# Altium PCB PCB1.PcbDoc (part 2 of 4)
Units mm, origin at the board's own origin, x right, y up, seen from the top; angles counter-clockwise.
Board outline 159.38 x 83.25 mm, 8 copper layers (Top Layer 1, GND, Signal 1, Signal 2, Power, Signal 3, Signal 4, Bottom Layer), stack 1.998 mm thick; 345 components, 291 nets, 1244 pads, 614 vias.
Unrouted connection lines stored in the file: 12.
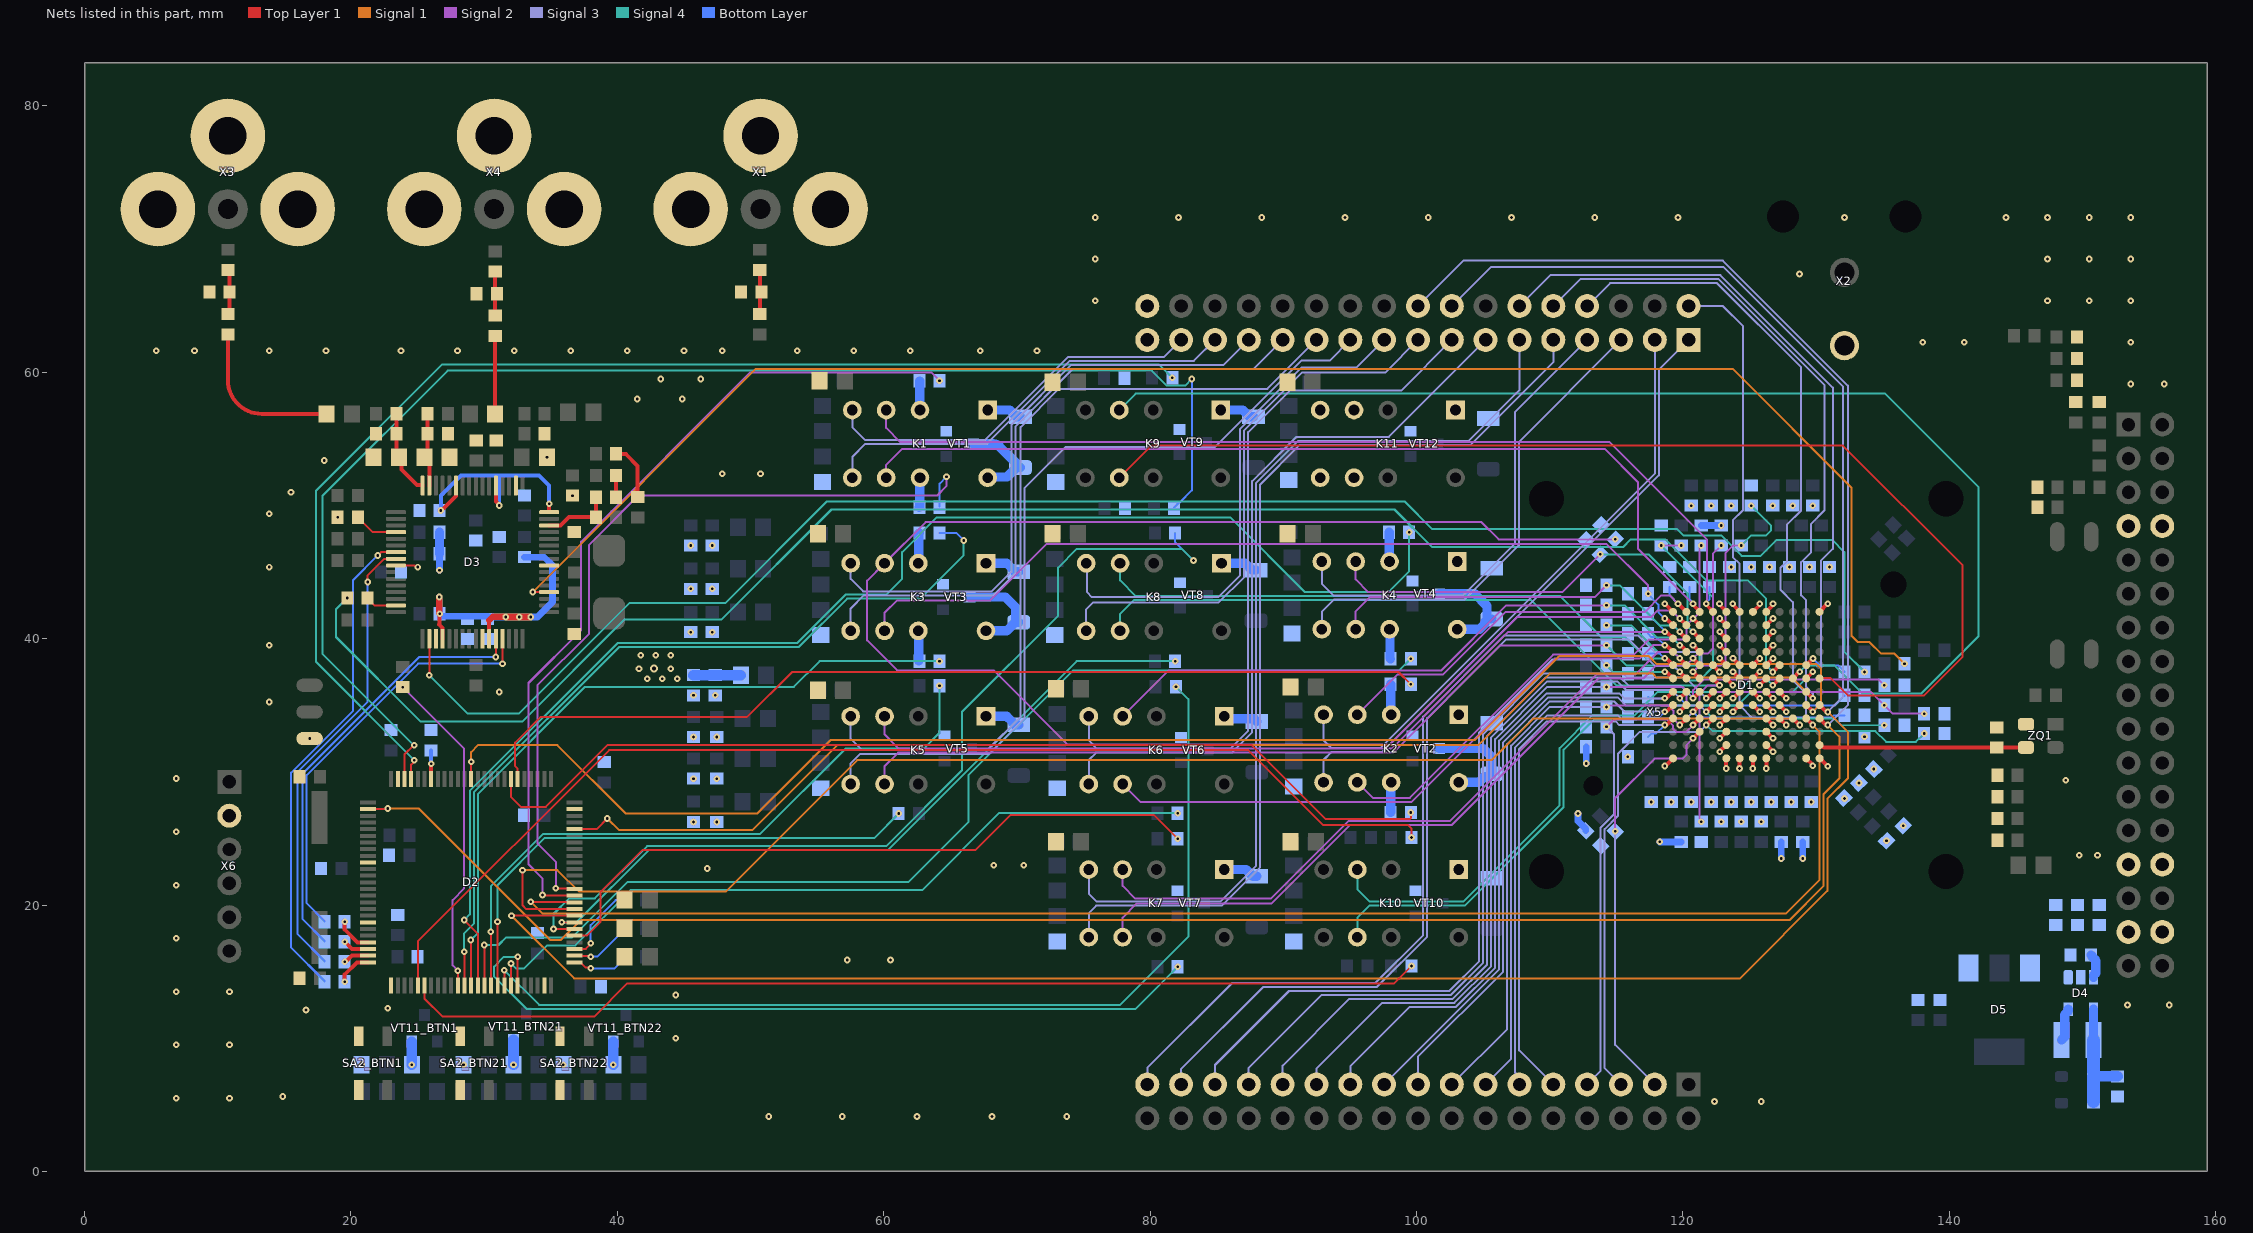
[diagram p8: the nets of this part, all layers, seen from the top]

## Via types
v1: diameter 0.5, hole 0.2, Top Layer 1 to Bottom Layer, tented both sides, 605 vias
v2: diameter 0.6, hole 0.3, Top Layer 1 to Bottom Layer, tented bottom, 6 vias
v3: diameter 0.6, hole 0.3, Top Layer 1 to Bottom Layer, tented both sides, 3 vias

## Nets (pads, with @x,y where several pads share a name; then routed paths per layer and width w, separated by ;. In a path a pad name is that pad's centre, name@x,y a point inside that pad or via, vN(x,y) a via of type N, cw(c..) or ccw(c..) an arc to the next point about the centre after c; other vN are vias at no path point) (continued)
+3.3V_VDDIO: C60.2 C61.2 C62.2 C63.2 D3.4 D3.11 L6.2 R46.2 R47.2 R64.2 R74.2 R153.2 | length 29.7
  Top Layer 1 w0.3: v1(26.655,41.875) 26.64,41.86 26.64,41.086 26.625,41.071 26.878,40.818 D3.4@26.878,39.994 ; D3.11@30.378,39.994 30.378,41.378
  Top Layer 1 w0.5: v1(26.625,43.125) 26.625,41.905 v1(26.655,41.875) ; 30.378,41.378 30.642,41.642 31.608,41.642 v1(31.625,41.625) v1(32.625,41.625) v1(33.5,41.625)
  Bottom Layer w0.5: v1(26.625,43.125) 26.625,41.905 26.848,41.682 30.308,41.682 30.365,41.625 v1(31.625,41.625) v1(32.625,41.625) v1(33.5,41.625) 34,41.625 35.125,42.75 35.125,45.5 34.51,46.115 R64.2@33.02,46.115 ; v1(26.645,45.145) R46.2@26.645,46.375
  Bottom Layer w0.7: R46.2@26.645,46.375 R47.2@26.645,48
  Bottom Layer w0.8: C61.2@45.719,37.26 45.719,37.25 L6.2@49.269,37.25
  other v1: 42.25,37 43.375,37 44.5,37 41.625,37.75 44,37.75 41.75,38.75 42.875,38.75 44,38.75 19,49.125
  other v2: 42.75,37.75
+5V: C69.1 C71.1 C72.1 D4.1 D5.3 K1.1 K2.1 K3.1 K4.1 K5.1 K6.1 K7.1 K8.1 K9.1 K10.1 K11.1 R171.1 VD15.2 VD16.2 VD17.2 VD18.2 VD19.2 VD20.2 VD21.2 VD28.2 VD29.2 VD30.2 VD31.2 X5.+5V | length 18.9
  Bottom Layer w0.7: K5.1@67.675,34.165 69.228,34.165 69.638,33.755 69.638,33.725 69.838,33.525 VD19.2@70.138,33.525 ; K3.1@67.675,45.665 69.228,45.665 69.638,45.255 69.638,45.225 69.838,45.025 VD17.2@70.138,45.025 ; K1.1@67.8,57.165 69.45,57.165 69.963,56.652 VD15.2@70.263,56.652 ; K9.1@85.3,57.165 86.95,57.165 87.463,56.652 VD30.2@87.763,56.652 ; K8.1@85.359,45.663 87.136,45.663 87.649,45.15 VD29.2@87.949,45.15 ; K7.1@85.55,22.665 87.2,22.665 87.713,22.152 VD28.2@88.013,22.152 ; K6.1@85.55,34.165 85.715,34 87.492,34 87.513,33.979 87.813,33.979 VD20.2@88.013,33.779
ADDR0: D1.H12 D2.58 X5.24 | length 182.9
  Top Layer 1 w0.15: v1(32.051,19.202) D2.58@36.768,19.202
  Top Layer 1 w0.3: D1.H12@130.275,34.995 130.713,34.557 130.818,34.557 v1(130.875,34.5)
  Signal 1 w0.15: v1(32.051,19.202) 36.753,14.5 124.287,14.5 130.85,21.063 130.85,27.975 132.375,29.5 132.375,33 v1(130.875,34.5)
  Signal 3 w0.15: X5.24@102.646,64.972 105.571,67.897 123.054,67.897 132,58.951 132,35.625 v1(130.875,34.5)
ADDR1: D1.J10 D2.59 X5.17 | length 148.3
  Top Layer 1 w0.15: v1(32.875,22.625) 32.875,20 33.173,19.702 D2.59@36.768,19.702
  Top Layer 1 w0.3: D1.J10@128.256,34.014 128.259,34.014 128.758,33.515 v1(128.761,33.515)
  Signal 1 w0.15: v1(32.875,22.625) 35.5,22.625 37.125,21 48.122,21 57.997,30.875 105.625,30.875 108.75,34 128.277,34 v1(128.761,33.515)
  Signal 3 w0.15: X5.17@120.426,64.972 123.009,64.972 124.5,63.481 124.5,49.625 123.75,48.875 123.75,46.125 124.25,45.625 124.25,35 125.25,34 126.375,34 128.277,34 v1(128.761,33.515)
ADDR2: D1.J11 D2.60 X5.20 | length 161.9
  Top Layer 1 w0.15: v1(33.5,20.25) 33.524,20.226 36.744,20.226 D2.60@36.768,20.202
  Top Layer 1 w0.3: D1.J11@129.256,34.014 D1.J11@129.256,34.014 129.756,33.515 v1(129.757,33.515)
  Signal 1 w0.15: v1(33.5,20.25) 34.375,19.375 127.75,19.375 130.25,21.875 130.25,32.625 130.25,33.023 v1(129.757,33.515)
  Signal 3 w0.15: X5.20@112.806,64.972 114.531,66.697 122.557,66.697 128.875,60.379 128.875,49.625 127.8,48.55 127.8,45.786 127.326,45.312 127.326,43.674 128.25,42.75 128.25,36.875 129.25,35.875 129.25,34.023 v1(129.757,33.515)
ADDR3: D1.J12 D2.2 X5.25 | length 192.5
  Top Layer 1 w0.15: D2.2@21.268,27.202 21.292,27.226 22.726,27.226 v1(22.75,27.25)
  Top Layer 1 w0.3: D1.J12@130.275,33.995 130.697,33.573 130.818,33.573 v1(130.875,33.515)
  Signal 1 w0.15: v1(22.75,27.25) 25.074,27.25 34.949,17.375 35.75,17.375 37.25,18.875 128,18.875 130.55,21.425 130.55,28.3 131.75,29.5 131.75,32.64 v1(130.875,33.515)
  Signal 3 w0.15: X5.25@100.106,64.972 103.509,68.375 123,68.375 132.375,59 132.375,35.015 v1(130.875,33.515)
AGND_5: D3.32 D3.37 D3.43 R98.1 | length 18.5
  Top Layer 1 w0.3: v1(26.75,49.625) 26.789,49.625 27.878,50.714 D3.43@27.878,51.494 ; D3.37@30.878,51.494 30.878,50.294 31.125,50.047 v1(31.125,50) ; D3.32@34.878,49.494 v1(34.878,50.128)
  Bottom Layer w0.3: R98.1@26.655,49.675 R98.1@26.655,49.625 v1(26.75,49.625) 26.75,50.75 28.25,52.25 31.125,52.25 ; v1(31.125,50) 31.125,52.25 ; v1(34.878,50.128) 34.878,51.497 34.125,52.25 31.125,52.25
ALSB_5: D3.52 R74.1 | length 3.4
  Top Layer 1 w0.15: R74.1@20.51,49.125 20.51,49.075 20.885,48.7 20.935,48.7 21.641,47.994 D3.52@23.378,47.994
BOOT0_3: D2.94 R45.1 | length 2.2
  Top Layer 1 w0.3: D2.94@26.018,29.452 v1(26.018,30.607)
  Bottom Layer w0.3: R45.1@26,31.615 26.018,31.597 v1(26.018,30.607)
Cb_1: C49.1 R99.1 | length 12.3
  Top Layer 1 w0.3: C49.1@10.76,62.854 10.76,59.415 ccw(c13.3,59.415) 13.3,56.875 R99.1@18.175,56.875
Cb_5: D3.48 R100.2 R101.2 R102.2 | length 6.4
  Top Layer 1 w0.3: R100.2@23.405,56.875 R101.2@23.405,55.375 23.405,53.814 23.806,53.413 23.806,52.694 24.954,51.546 25.378,51.546 D3.48@25.378,51.494
Cr_1: C50.1 R95.1 | length 5.9
  Top Layer 1 w0.3: R95.1@30.825,56.875 30.826,56.876 C50.1@30.826,62.727
Cr_5: D3.47 R94.2 R96.2 R97.2 | length 5.6
  Top Layer 1 w0.3: R96.2@25.76,56.875 R94.2@25.76,55.375 25.76,53.867 R97.2@25.511,53.618 25.878,53.251 D3.47@25.878,51.494
DGND_1: K11.4 R2.1 R3.1 R4.1 R5.1 R8.1 R9.1 R11.1 R12.1 R14.1 R15.1 R17.1 R18.1 R20.1 R21.1 R23.1 R24.1 R26.1 R27.1 R29.1 R30.1 R32.1 R33.1 R35.1 R36.1 R37.1 R38.1 R39.1 R40.1 R41.1 R42.1 R43.1 R44.1 | length 1.5
  Bottom Layer w0.5: R11.1@121.375,48.51 121.375,48.5 v1(122.875,48.5)
DGND_2: K11.9 R1.1 R6.1 R7.1 R10.1 R13.1 R16.1 R19.1 R22.1 R25.1 R28.1 R31.1 R34.1 R152.1 | length 6.9
  Bottom Layer w0.5: v1(112.125,26.875) 112.125,26.302 112.713,25.715 R10.1@112.713,25.588 ; R1.1@112.74,31.875 112.74,30.625 v1(112.75,30.625) ; v1(118.25,24.75) 118.26,24.74 R7.1@119.875,24.74 ; v1(127.375,23.5) R34.1@127.375,24.74 ; v1(129,23.5) R31.1@129,24.74
  other v1: 117.625,27.74 119.125,27.74 120.625,27.74 122.125,27.74 129.625,27.74 134.338,30.213 115.865,31.125 133.635,32.625
ELPF_5: D3.30 R56.1 R58.1 | length 5.3
  Top Layer 1 w0.3: D3.30@34.878,48.494 35.744,48.494 36.375,49.125 R56.1@38.385,49.125 R58.1@38.385,50.625
FIELD_1: D1.E9 R73.2 | length 129.6
  Top Layer 1 w0.3: v1(126.75,37.5) 126.75,37.504 127.256,38.01 D1.E9@127.256,38.014
  Signal 4 w0.15: v1(19.73,43.053) 18.875,42.198 18.875,40.125 25.225,33.775 32.847,33.775 40.497,41.425 47.8,41.425 56.075,49.7 98.343,49.7 101.168,46.875 115.5,46.875 116.075,47.45 118.675,47.45 121.75,44.375 124.875,44.375 126.25,43 126.25,38 v1(126.75,37.5)
FIELD_5: D3.63 R73.1 | length 2.4
  Top Layer 1 w0.15: R73.1@21.25,43.053 21.25,43.003 21.759,42.494 D3.63@23.378,42.494
FMC_D0: D2.61 R107.2 | length 63.5
  Top Layer 1 w0.15: v1(34.375,20.75) 34.423,20.702 D2.61@36.768,20.702
  Signal 2 w0.15: v1(34.375,20.75) 34.375,22 33.325,23.05 33.325,36.674 37.275,40.624 37.275,47.291 49.984,60 63.556,60 v1(64.187,59.369)
FMC_D1: D2.62 R109.2 | length 61.2
  Top Layer 1 w0.15: v1(35.375,21.25) 35.399,21.226 36.744,21.226 D2.62@36.768,21.202
  Signal 2 w0.15: v1(35.375,21.25) 35.375,23.25 34,24.625 34,36.5 37.875,40.375 37.875,47.043 41.582,50.75 64,50.75 64.705,51.455 v1(64.705,52.15)
  Bottom Layer w0.15: R109.2@64.187,49.919 64.187,51.632 v1(64.705,52.15)
FMC_D2: D2.81 R103.2 | length 72.7
  Top Layer 1 w0.15: D2.81@32.518,29.452 32.518,30.232 32.325,30.425 32.325,32.2 34.25,34.125 49.75,34.125 53.125,37.5 98.646,37.5 v1(99.57,36.576)
FMC_D3: D2.82 R110.2 | length 73.9
  Top Layer 1 w0.15: D2.82@32.018,29.452 32.018,28.107 32.75,27.375 34.625,27.375 39.25,32 87.618,32 93.173,26.445 99.482,26.445 99.57,26.533 v1(99.57,26.951)
FMC_D4: D2.37 R104.2 | length 62.1
  Top Layer 1 w0.15: v1(28.5,16.5) 28.509,16.491 28.509,13.961 D2.37@28.518,13.952
  Signal 4 w0.15: v1(28.5,16.5) 28.5,17.875 29.225,18.6 29.225,28.456 40.144,39.375 53.625,39.375 57.25,43 62.75,43 66,46.25 v1(66,47.375)
  Bottom Layer w0.15: R104.2@64.189,47.939 65.436,47.939 v1(66,47.375)
FMC_D5: D2.38 R111.2 | length 53.4
  Top Layer 1 w0.15: v1(29,17.375) 29.009,17.366 29.009,13.961 D2.38@29.018,13.952
  Signal 4 w0.15: v1(29,17.375) 29.525,17.9 29.525,28.332 37.568,36.375 53.25,36.375 55.189,38.314 v1(64.189,38.314)
FMC_D6: D2.39 R105.2 | length 101.3
  Top Layer 1 w0.15: v1(28.5,18.875) 29.518,17.857 D2.39@29.518,13.952
  Signal 4 w0.15: v1(28.5,18.875) 28.925,19.3 28.925,28.58 40.02,39.675 53.501,39.675 57.126,43.3 60.175,43.3 61.375,44.5 61.375,46.5 63.975,49.1 86.025,49.1 91.625,43.5 97.875,43.5 99.445,45.07 v1(99.445,47.997)
FMC_D7: D2.40 R112.2 | length 83.6
  Top Layer 1 w0.15: v1(30,17) 30.009,16.991 30.009,13.961 D2.40@30.018,13.952
  Signal 4 w0.15: v1(30,17) 31.076,17 31.651,17.575 36.601,17.575 40.751,21.725 61.849,21.725 66.375,26.251 66.375,29.771 74.229,37.625 98.698,37.625 v1(99.57,38.497)
FMC_D8: D2.41 R106.2 | length 49.5
  Top Layer 1 w0.15: v1(30.5,18) 30.509,17.991 30.509,13.961 D2.41@30.518,13.952
  Signal 4 w0.15: v1(30.5,18) 30.5,21.424 34.401,25.325 50.7,25.325 57.125,31.75 63,31.75 64.185,32.935 v1(64.185,36.463)
FMC_D9: D2.42 R113.2 | length 39.9
  Top Layer 1 w0.15: v1(31,18.75) 31.009,18.741 31.009,13.961 D2.42@31.018,13.952
  Signal 4 w0.15: v1(31,18.75) 31,21.5 34.525,25.025 59.275,25.025 v1(61.125,26.875)
FMC_D10: D2.43 R108.2 | length 74.9
  Top Layer 1 w0.15: D2.43@31.518,13.952 v1(31.518,15.107)
  Signal 4 w0.15: v1(31.518,15.107) 34.125,12.5 77.75,12.5 82.875,17.625 82.875,35.457 v1(81.937,36.395)
FMC_D11: D2.44 R114.2 | length 56.7
  Top Layer 1 w0.15: D2.44@32.018,13.952 v1(32.018,15.607)
  Signal 4 w0.15: v1(32.018,15.607) 32.375,15.25 33,15.25 34.725,16.975 36.85,16.975 41,21.125 62.875,21.125 68.645,26.895 v1(82.062,26.895)
FMC_D12: D2.45 R134.2 | length 58.6
  Top Layer 1 w0.15: D2.45@32.518,13.952 v1(32.518,16.107)
  Signal 4 w0.15: v1(32.518,16.107) 31.482,16.107 30.75,15.375 30.75,14.625 33.175,12.2 78.905,12.2 v1(82.064,15.359)
FMC_D13: D2.55 R127.2 | length 51.1
  Top Layer 1 w0.15: D2.55@36.768,17.702 37.702,17.702 38.75,18.75 38.75,21 41.875,24.125 66.875,24.125 69.5,26.75 80.298,26.75 v1(82.064,24.984)
FMC_D14: D2.56 R128.2 | length 69.8
  Top Layer 1 w0.15: v1(35.202,18.202) D2.56@36.768,18.202
  Signal 4 w0.15: v1(35.202,18.202) 35.202,19.327 36.375,20.5 38.304,20.5 42.229,24.425 60.18,24.425 65.875,30.12 65.875,34.521 73.086,41.732 73.086,45.336 74.5,46.75 82.375,46.75 v1(83.25,45.875)
  Bottom Layer w0.15: R128.2@81.875,47.933 81.875,47.25 v1(83.25,45.875)
FMC_D15: D2.57 R133.2 | length 55.1
  Top Layer 1 w0.15: v1(35.827,18.702) D2.57@36.768,18.702
  Signal 4 w0.15: v1(35.827,18.702) 36.931,18.702 42.354,24.125 60.304,24.125 74.487,38.308 v1(81.875,38.308)
GND: C1.1 C2.2 C3.2 C4.2 C5.2 C6.2 C7.2 C8.2 C9.2 C10.2 C11.2 C12.2 C13.2 C14.2 C15.2 C16.2 C17.2 C18.2 C19.2 C20.2 C21.2 C22.2 C23.2 C24.2 C25.2 C26.2 C27.2 C28.2 C29.2 C30.2 C31.2 C32.2 C33.1 C34.1 C35.1 C36.1 C37.1 C38.1 C39.1 C40.1 C41.1 C42.1 C43.1 C44.1 C45.1 C46.1 C47.1 C51.2 C52.2 C53.1 C55.1 C57.2 C58.2 C59.2 C60.1 C61.1 C62.1 C63.1 C64.1 C65.1 C66.1 C67.1 C68.1 C69.2 C70.2 C71.2 C72.2 C73.2 C74.2 C75_BTN1.1 C75_BTN21.1 C75_BTN22.1 C76.1 C77.1 C78.1 C79.1 C80.1 C81.1 C82.2 C83.2 D1.A1 D1.A5 D1.A6 D1.A7 D1.A8 D1.A12 D1.B5 D1.B8 D1.C5 D1.C8 D1.D5 D1.D8 D1.E4 D1.E5 D1.E6 D1.E7 D1.E8 D1.F5 D1.F6 D1.F7 D1.F8 D1.G5 D1.G6 D1.G7 D1.G8 D1.G9 D1.H5 D1.H6 D1.H7 D1.H8 D1.H9 D1.J5 D1.J8 D1.J9 D1.K5 D1.K8 D1.L5 D1.L8 D1.M1 D1.M5 D1.M6 D1.M7 D1.M8 D1.M11 D1.M12 D2.10 D2.19 D2.26 D2.49 D2.74 D2.99 D3.3 D3.10 D3.24 D3.34 D3.57 D4.2 D5.1 K11.5 K11.8 KP3.1 R45.2 R50.1 R52.2 R54.2 R90.1 R93.1 R94.1 R97.1 R98.2 R101.1 R102.1 R121.1 R122.1 R123.1 R124.1 R125.1 R126.1 R132.2 R137.2 R143.1 R144.1 R145.1 R146.1 R149_BTN1.1 R149_BTN21.1 R149_BTN22.1 R151.1 SA2_BTN1.2 SA2_BTN1.3 SA2_BTN21.2 SA2_BTN21.3 SA2_BTN22.2 SA2_BTN22.3 VD1.2 VD2.2 VD3.2 VD4.2 VD5.2 VD6.2 VD7.2 VD8.2 VD9.2 VD10.2 VD11.2 VD12.2 VD13.2 VD14.2 VT1.2 VT2.2 VT3.2 VT4.2 VT5.2 VT6.2 VT7.2 VT8.2 VT9.2 VT10.2 VT11_BTN1.2 VT11_BTN21.2 VT11_BTN22.2 VT12.2 X1.2 X2.2 X3.2 X4.2 X5.GND X6.2 ZQ1.2 | length 40.2
  Top Layer 1 w0.15: D3.57@23.378,45.494 24.786,45.494 24.905,45.375 v1(25,45.375)
  Top Layer 1 w0.3: v1(118.625,30.442) 118.684,30.442 D1.M1@119.256,31.014 ; v1(118.625,42.625) 118.635,42.625 119.227,42.033 D1.A1@119.275,42.033 ; D1.E4@122.256,38.014 122.256,38.004 122.75,37.51 v1(122.75,37.5) ; v1(122.75,42.625) 122.75,42.547 123.264,42.033 D1.A5@123.275,42.033 ; v1(122.757,38.518) 122.757,38.515 123.256,38.017 D1.E5@123.256,38.014 ; v1(122.757,39.505) 122.761,39.505 123.252,39.014 D1.D5@123.256,39.014 ; v1(122.757,40.515) D1.C5@123.256,40.014 ; v1(122.757,41.51) 122.759,41.51 D1.B5@123.256,41.014 D1.B5@123.256,41.014 ; v1(122.758,31.512) v1(122.758,31.512) D1.L5@123.256,32.014 D1.L5@123.256,32.014 ; v1@122.758,32.515 D1.K5@123.256,33.014 ; v1@122.758,33.516 D1.J5@123.256,34.014 ; v1(122.758,34.515) D1.H5@123.256,35.014 ; v1@122.759,35.518 D1.G5@123.256,36.014 ; D1.M5@123.237,30.995 123.25,30.982 v1(123.25,30.25) ; D1.F5@123.256,37.014 123.256,37.004 123.75,36.51 v1(123.75,36.5) ; v1(123.75,42.625) 123.75,42.547 124.264,42.033 D1.A6@124.275,42.033 ; v1(123.759,34.515) D1.H6@124.256,35.014 ; v1(123.759,35.518) D1.G6@124.256,36.014 ; v1(123.759,37.518) 123.759,37.514 124.256,37.017 D1.F6@124.256,37.014 ; v1(123.759,38.518) 123.759,38.515 124.256,38.018 D1.E6@124.256,38.014 ; D1.M6@124.248,30.995 124.253,30.99 124.253,30.253 v1(124.25,30.25) ; v1(125.25,30.25) 125.253,30.253 125.253,30.973 D1.M7@125.275,30.995 ; D1.H7@125.256,35.014 125.261,35.014 125.757,34.518 v1(125.762,34.518) ; D1.G7@125.256,36.014 125.261,36.014 125.757,35.518 v1(125.762,35.518) ; D1.F7@125.256,37.014 v1@125.759,37.517 ; D1.E7@125.256,38.014 125.259,38.014 125.759,38.514 v1(125.762,38.514) ; D1.A7@125.275,42.033 125.693,42.451 125.693,42.568 v1@125.75,42.625 ; v1(125.75,36.5) 125.75,36.504 126.256,37.01 D1.F8@126.256,37.014 ; v1@126.256,30.256 D1.M8@126.256,31.014 ; D1.L8@126.256,32.014 v1(126.757,31.512) ; D1.K8@126.256,33.014 126.259,33.014 126.754,32.518 v1(126.757,32.518) ; D1.H8@126.256,35.014 126.259,35.014 126.754,34.518 v1(126.757,34.518) ; D1.G8@126.256,36.014 126.259,36.014 126.754,35.518 v1(126.757,35.518) ; D1.E8@126.256,38.014 v1(126.757,38.514) ; D1.C8@126.256,40.014 v1(126.756,40.514) ; D1.B8@126.256,41.014 D1.B8@126.256,41.014 v1(126.756,41.51) v1(126.756,41.51) ; D1.J8@126.256,34.014 v1@126.756,33.515 ; D1.D8@126.256,39.014 v1(126.757,39.514) ; D1.A8@126.275,42.033 126.693,42.451 126.693,42.568 v1@126.75,42.625 ; D1.J9@127.256,34.014 127.257,34.014 127.756,33.515 v1(127.757,33.515) ; D1.H9@127.256,35.014 127.259,35.014 127.755,34.518 v1(127.757,34.518) ; D1.G9@127.256,36.014 127.258,36.014 127.754,35.518 v1@127.757,35.518 ; D1.M11@129.256,31.014 129.757,30.513 v1(129.757,30.448) ; D1.M12@130.256,31.014 130.273,31.014 130.858,30.43 v1(130.875,30.43) ; D1.A12@130.256,42.014 v1(130.867,42.625)
  Bottom Layer w0.8: v1(24.57,8) VT11_BTN1.2@24.57,9.75 ; v1(32.195,8) VT11_BTN21.2@32.195,9.875 ; v1(39.695,8) VT11_BTN22.2@39.695,9.75
  other v1: 51.375,4.125 56.875,4.125 62.5,4.125 68.125,4.125 73.75,4.125 122.375,5.25 125.875,5.25 6.875,5.5 10.875,5.5 14.875,5.625 20.8,8 28.445,8 35.945,8 6.875,9.5 10.875,9.5 44.375,10 16.625,12.125 22.75,12.25 153.375,12.5 156.5,12.5 44.375,13.25 6.875,13.5 10.875,13.5 57.25,15.875 60.5,15.875 6.875,17.5 6.875,21.5 46.75,22.75 68.25,23 70.5,23 149.75,23.75 151.125,23.75 135.287,24.838 6.875,25.5 136.537,25.963 45.719,26.24 47.469,26.24 122.875,26.26 124.375,26.26 125.875,26.26 123.625,27.74 125.125,27.74 126.625,27.74 128.125,27.74 132.125,28 133.213,29.162 148.75,29.375 45.719,29.49 47.469,29.49 6.875,29.5 126.25,30.25 16.895,32.5 122.758,32.514 45.719,32.615 47.469,32.615 122.758,33.515 126.757,33.515 13.875,35.25 122.758,35.518 127.757,35.518 45.719,35.74 47.344,35.74 31.125,36 125.762,37.518 13.875,39.5 45.5,40.49 47.125,40.49 125.758,42.625 126.756,42.625 47.125,43.74 45.5,43.75 13.875,45.375 123.625,45.375 125.125,45.375 126.5,45.385 128,45.385 129.5,45.385 131,45.385 45.5,46.99 47.125,46.99 13.875,49.375 120.625,49.99 122.125,49.99 123.625,49.99 126.75,49.99 128.25,49.99 129.75,49.99 36.625,50.74 15.5,51 47.875,52.375 50.75,52.375 18,53.375 34.72,53.618 41.5,58 44.875,58 153.625,59.125 156.125,59.125 43.25,59.5 46.25,59.5 5.375,61.625 8.25,61.625 13.875,61.625 18.125,61.625 23.75,61.625 28,61.625 32.25,61.625 36.5,61.625 40.75,61.625 45,61.625 47.875,61.625 53.5,61.625 57.75,61.625 62,61.625 67.25,61.625 71.5,61.625 138,62.25 141.125,62.25 153.625,62.25 75.875,65.375 147.375,65.375 150.5,65.375 153.625,65.375 128.75,67.375 75.875,68.5 147.375,68.5 150.5,68.5 153.625,68.5 75.875,71.625 82.125,71.625 88.375,71.625 94.625,71.625 100.875,71.625 107.125,71.625 113.375,71.625 119.625,71.625 132.125,71.625 144.25,71.625 147.375,71.625 150.5,71.625 153.625,71.625
GPO0_1: D2.22 R77.2 | length 2.7
  Top Layer 1 w0.3: v1(19.53,18.75) 19.53,18.169 20.497,17.202 D2.22@21.268,17.202
GPO0_5: D3.13 R77.1 | length 31.6
  Top Layer 1 w0.15: v1(31.378,38.128) D3.13@31.378,39.994
  Bottom Layer w0.15: R77.1@18.01,18.75 18.01,18.8 16.662,20.148 16.662,29.753 25.037,38.128 v1(31.378,38.128)
GPO1_1: D2.23 R81.2 | length 2
  Top Layer 1 w0.3: v1(19.53,17.25) 20.078,16.702 D2.23@21.268,16.702
GPO1_5: D3.12 R81.1 | length 32.8
  Top Layer 1 w0.15: v1(30.875,38.625) 30.877,38.627 30.877,39.992 D3.12@30.878,39.994
  Bottom Layer w0.15: R81.1@18.01,17.25 18.01,17.3 16.362,18.948 16.362,29.877 25.11,38.625 v1(30.875,38.625)
GPO2_1: D2.24 R84.2 | length 1.9
  Top Layer 1 w0.3: v1(19.53,15.75) 19.611,15.75 20.063,16.202 D2.24@21.268,16.202
GPO2_5: D3.56 R84.1 | length 34.7
  Top Layer 1 w0.15: v1(21.25,44.25) 21.25,44.75 22.494,45.994 D3.56@23.378,45.994
  Bottom Layer w0.15: R84.1@18.01,15.75 18.01,15.8 16,17.81 16,30.011 21.25,35.261 v1(21.25,44.25)
GPO3_1: D2.25 R87.2 | length 2.6
  Top Layer 1 w0.3: v1(19.53,14.25) 19.53,14.78 20.452,15.702 D2.25@21.268,15.702
GPO3_5: D3.55 R87.1 | length 37.2
  Top Layer 1 w0.15: v1(22,46.25) 22.019,46.25 22.263,46.494 D3.55@23.378,46.494
  Bottom Layer w0.15: R87.1@18.01,14.25 18.01,14.3 15.5,16.81 15.5,29.936 20.155,34.591 20.155,44.405 v1(22,46.25)
HDATA0: D1.A4 K1.4 R2.2 | length 73.4
  Top Layer 1 w0.3: v1(121.75,42.625) 121.75,42.547 122.264,42.033 D1.A4@122.275,42.033
  Signal 2 w0.15: K1.4@60.18,57.165 60.18,55.82 61.25,54.75 114.5,54.75 121.8,47.45 121.8,42.675 v1(121.75,42.625)
  Bottom Layer w0.15: v1(121.75,42.625) 121.75,42.72 122,42.97 R2.2@122,43.865
HDATA0_F: K1.5 X5.16 | length 29.5
  Signal 3 w0.15: K1.5@57.64,57.165 57.64,55.86 58.575,54.925 67.609,54.925 73.834,61.15 81.044,61.15 X5.16@82.326,62.432
HDATA1: D1.A3 K1.9 R4.2 | length 71.9
  Top Layer 1 w0.3: v1(120.75,42.625) 120.75,42.547 121.264,42.033 D1.A3@121.275,42.033
  Signal 2 w0.15: K1.9@60.18,52.085 60.18,53.055 61.375,54.25 114.125,54.25 116.625,51.75 116.625,46.75 v1(120.75,42.625)
  Bottom Layer w0.15: R4.2@120.5,43.865 120.5,42.97 120.75,42.72 v1(120.75,42.625)
HDATA1_F: K1.8 X5.15 | length 32.4
  Signal 3 w0.15: K1.8@57.64,52.085 57.64,53.64 58.625,54.625 67.734,54.625 73.959,60.85 83.284,60.85 X5.15@84.866,62.432
HDATA2: D1.A2 K2.4 R8.2 | length 30.4
  Top Layer 1 w0.3: v1(119.625,42.625) 119.635,42.625 120.227,42.033 D1.A2@120.275,42.033
  Signal 2 w0.15: K2.4@95.555,34.29 98.59,37.325 101.999,37.325 106.674,42 117.125,42 118.375,43.25 119,43.25 v1(119.625,42.625)
  Bottom Layer w0.15: R8.2@119,43.865 119,43.25 v1(119.625,42.625)
HDATA2_F: K2.5 X5.2 | length 45.6
  Signal 3 w0.15: K2.5@93.015,34.29 93.015,32.36 93.575,31.8 97.3,31.8 117.886,52.386 X5.2@117.886,62.432
HDATA3: D1.B3 K2.9 R11.2 | length 38.1
  Top Layer 1 w0.3: v1(120.761,41.51) D1.B3@121.256,41.014
  Signal 2 w0.15: K2.9@95.555,29.21 96.715,28.05 99.501,28.05 110.251,38.8 116.3,38.8 117.434,39.934 119.934,39.934 120.25,40.25 120.25,40.998 v1(120.761,41.51) 121.25,41.998 121.25,46.77 121.375,46.895 v1(121.375,46.99)
HDATA3_F: K2.8 X5.1 | length 46.8
  Signal 3 w0.15: K2.8@93.015,29.21 93.015,30.89 93.625,31.5 97.424,31.5 118.186,52.262 118.186,60.192 X5.1@120.426,62.432
HDATA4: D1.B2 K3.4 R14.2 | length 132.4
  Top Layer 1 w0.3: v1(119.755,41.51) 119.758,41.51 120.253,41.014 D1.B2@120.256,41.014
  Signal 2 w0.15: v1(114.912,47.463) 106.162,47.463 104.875,48.75 63.14,48.75 K3.4@60.055,45.665 58.75,44.36 58.75,39.875 61,37.625 68.25,37.625 73.825,32.05 98.001,32.05 107.576,41.625 117.625,41.625 118.125,42.125 119.14,42.125 v1(119.755,41.51)
HDATA4_F: K3.5 X5.14 | length 45.7
  Signal 3 w0.15: K3.5@57.515,45.665 57.515,44.485 58.45,43.55 68.104,43.55 69.575,45.021 69.575,45.374 69.575,56.042 74.083,60.55 85.524,60.55 X5.14@87.406,62.432
HDATA5: D1.B1 K3.9 R17.2 | length 65.9
  Top Layer 1 w0.3: v1(118.625,41.51) 118.682,41.452 118.818,41.452 D1.B1@119.237,41.033
  Signal 2 w0.15: K3.9@60.055,40.585 60.055,41.93 61,42.875 68,42.875 72.25,47.125 114.25,47.125 117.385,43.99 v1(117.385,43.375)
  Bottom Layer w0.15: v1(117.385,43.375) 117.385,43.325 118.159,42.551 118.159,41.976 v1(118.625,41.51)
HDATA5_F: K3.8 X5.13 | length 48.9
  Signal 3 w0.15: K3.8@57.515,40.585 57.515,42.265 58.5,43.25 68.229,43.25 69.875,44.896 69.875,45.25 69.875,55.918 74.207,60.25 87.764,60.25 X5.13@89.946,62.432
HDATA6: D1.C3 K4.4 R20.2 | length 32.8
  Top Layer 1 w0.3: v1@120.761,40.515 120.761,40.512 121.256,40.017 D1.C3@121.256,40.014
  Signal 2 w0.15: K4.4@95.43,45.79 95.43,44.445 96.375,43.5 110.95,43.5 v1(113.787,46.338)
  Signal 4 w0.15: v1(113.787,46.338) 117.412,46.338 120.325,43.425 120.325,40.948 v1(120.758,40.515)
HDATA6_F: K4.5 X5.4 | length 35.7
  Signal 3 w0.15: K4.5@92.89,45.79 92.89,44.11 93.75,43.25 103.5,43.25 107.375,47.125 107.375,57.001 X5.4@112.806,62.432
HDATA7: D1.C2 K4.9 R23.2 | length 28.6
  Top Layer 1 w0.3: v1(119.755,40.515) D1.C2@120.256,40.014
  Signal 2 w0.15: K4.9@95.43,40.71 95.43,42.055 96.5,43.125 113.385,43.125 v1(114.26,44)
  Signal 4 w0.15: v1(114.26,44) 115.25,44 118.25,41 119.27,41 v1(119.755,40.515)
HDATA7_F: K4.8 X5.3 | length 36.8
  Signal 3 w0.15: K4.8@92.89,40.71 92.89,42.015 93.825,42.95 103.624,42.95 107.675,47.001 107.675,54.761 X5.3@115.346,62.432
HDATA8: D1.C1 K5.4 R26.2 | length 66.7
  Top Layer 1 w0.3: v1(118.625,40.515) 118.682,40.457 118.813,40.457 D1.C1@119.237,40.033
  Signal 2 w0.15: K5.4@60.055,34.165 60.055,32.82 61.125,31.75 98.125,31.75 106.89,40.515 v1(118.625,40.515)
  Bottom Layer w0.15: R26.2@117.385,41.875 117.385,41.825 118.625,40.585 v1(118.625,40.515)
HDATA8_F: K5.5 X5.12 | length 62.5
  Signal 3 w0.15: K5.5@57.515,34.165 57.515,32.485 58.375,31.625 67.75,31.625 70.274,34.149 70.274,55.875 73.149,58.75 88.804,58.75 X5.12@92.486,62.432
HDATA9: D1.D3 K5.9 R29.2 | length 69.2
  Top Layer 1 w0.3: v1@120.758,39.509 v1(120.76,39.509) 121.254,39.014 D1.D3@121.256,39.014
  Signal 2 w0.15: K5.9@60.055,29.085 60.055,30.43 61.075,31.45 98.249,31.45 106.299,39.5 v1(114.26,39.5)
  Signal 4 w0.15: v1(114.26,39.5) 115.76,38 121,38 121.25,38.25 121.25,39.019 v1(120.76,39.509)
HDATA9_F: K5.8 X5.11 | length 62.4
  Signal 3 w0.15: K5.8@57.515,29.085 57.515,30.64 58.2,31.325 67.874,31.325 70.574,34.024 70.574,51.324 73.625,54.375 84.853,54.375 91.353,60.875 93.469,60.875 X5.11@95.026,62.432
HDATA10: D1.D2 K6.4 R32.2 | length 47.3
  Top Layer 1 w0.3: v1(119.755,39.509) 119.794,39.47 119.869,39.47 120.256,39.083 D1.D2@120.256,39.014
  Signal 2 w0.15: K6.4@77.93,34.165 81.39,37.625 101.875,37.625 106.75,42.5 v1(114.26,42.5)
  Signal 4 w0.15: v1(114.26,42.5) 115.625,42.5 118.035,40.09 119.174,40.09 v1(119.755,39.509)
HDATA10_F: K6.5 X5.8 | length 55.2
  Signal 3 w0.15: K6.5@75.39,34.165 75.39,32.36 76,31.75 86,31.75 87.35,33.1 87.35,55.511 90.464,58.625 98.839,58.625 X5.8@102.646,62.432
HDATA11: D1.D1 K6.9 R35.2 | length 48.5
  Top Layer 1 w0.3: v1(118.625,39.509) 118.682,39.451 118.819,39.451 D1.D1@119.237,39.033
  Signal 2 w0.15: K6.9@77.93,29.085 79.265,27.75 99.625,27.75 110.375,38.5 116.75,38.5 117.759,39.509 v1@118.621,39.509
  Bottom Layer w0.15: R35.2@117.385,40.375 117.637,40.123 118.01,40.123 v1(118.625,39.509)
HDATA11_F: K6.8 X5.7 | length 55.7
  Signal 3 w0.15: K6.8@75.39,29.085 75.39,30.89 75.95,31.45 86.124,31.45 87.65,32.976 87.65,51.824 90.985,55.159 97.913,55.159 X5.7@105.186,62.432
HDATA12: D1.E3 K7.9 R37.2 | length 62.9
  Top Layer 1 w0.3: v1(120.76,38.518) 120.76,38.514 121.256,38.018 D1.E3@121.256,38.014
  Signal 2 w0.15: K7.9@77.93,17.585 77.93,19.055 79,20.125 85.625,20.125 89.125,20.125 95,26 102.625,26 113.625,37 117,37 118,38 120.242,38 v1(120.76,38.518) 121.117,38.875 121.875,38.875 122.25,39.25 122.25,46.365 v1(122.875,46.99)
HDATA12_F: K7.8 X5.5 | length 72.3
  Signal 3 w0.15: K7.8@75.39,17.585 75.39,19.39 75.95,19.95 85.374,19.95 88.25,22.826 88.25,51.576 91.234,54.559 104.059,54.559 110.266,60.766 X5.5@110.266,62.432
HDATA13: D1.E2 K7.4 R39.2 | length 58.5
  Top Layer 1 w0.3: v1(119.755,38.518) 119.755,38.517 D1.E2@120.256,38.014 D1.E2@120.256,38.014
  Signal 2 w0.15: K7.4@77.93,22.665 77.93,21.445 78.888,20.487 89.063,20.487 94.876,26.3 102.501,26.3 113.501,37.3 116.425,37.3 118.125,39 119.274,39 v1(119.755,38.518)
  Signal 4 w0.15: v1(114.26,41) 116.125,41 118.125,39 119.274,39 v1(119.755,38.518)
HDATA13_F: K7.5 X5.6 | length 70.9
  Signal 3 w0.15: K7.5@75.39,22.665 75.39,20.86 76,20.25 85.25,20.25 87.95,22.95 87.95,51.7 91.109,54.859 103.935,54.859 107.726,58.65 X5.6@107.726,62.432
HDATA14: D1.E1 K8.4 R41.2 | length 46.8
  Top Layer 1 w0.3: v1(118.625,38.518) 118.682,38.461 118.809,38.461 D1.E1@119.237,38.033
  Signal 4 w0.15: K8.4@77.739,45.663 77.739,44.386 78.925,43.2 110.8,43.2 113.875,40.125 115.625,40.125 117.232,38.518 v1(118.625,38.518)
  Bottom Layer w0.15: R41.2@117.385,38.875 118.268,38.875 v1(118.625,38.518)
HDATA14_F: K8.5 X5.10 | length 39.1
  Signal 3 w0.15: K8.5@75.199,45.663 75.262,45.6 75.262,43.488 75.625,43.125 85.125,43.125 86.75,44.75 86.75,55.76 91.365,60.375 95.509,60.375 X5.10@97.566,62.432
HDATA15: D1.F4 K8.9 R43.2 | length 61.5
  Top Layer 1 w0.3: D1.F4@122.256,37.014 122.256,37.004 122.75,36.51 v1(122.75,36.5)
  Signal 2 w0.15: v1(121.382,26.268) 121.382,26.389 121.25,26.522 121.25,35.875 121.875,36.5 v1(122.75,36.5)
  Signal 4 w0.15: K8.9@77.739,40.583 77.739,41.864 78.775,42.9 108.6,42.9 115,36.5 v1(122.75,36.5)
HDATA15_F: K8.8 X5.9 | length 41.4
  Signal 3 w0.15: K8.8@75.199,40.583 75.199,42.199 75.724,42.724 85.148,42.724 87.05,44.626 87.05,55.635 91.415,60 97.674,60 X5.9@100.106,62.432
HDATA16_1: D1.F3 R44.2 R80.2 X5.49 | length 86.2
  Top Layer 1 w0.3: v1(120.76,37.515) 120.76,37.512 121.256,37.017 D1.F3@121.256,37.014
  Signal 2 w0.15: v1(120.76,37.515) 121.246,38 122.84,38 123.2,38.36 123.2,46.45 123.74,46.99 v1(124.375,46.99) ; v1@125.105,49.99 v1(125.125,49.99)
  Signal 3 w0.15: X5.49@79.786,6.532 79.786,7.786 86.15,14.15 96.9,14.15 100.5,17.75 100.5,34.151 106.596,40.248 116.627,40.248 117.875,39 121.125,39 121.375,38.75 121.375,38.129 v1(120.76,37.515)
  Signal 4 w0.15: v1(124.375,46.99) 125.135,47.75 126.25,47.75 126.625,48.125 126.625,48.49 v1(125.125,49.99)
HDATA17_1: D1.F2 R42.2 R83.2 X5.50 | length 78.7
  Top Layer 1 w0.3: v1(119.755,37.515) D1.F2@120.256,37.014
  Signal 2 w0.15: v1(118.375,46.99) v1(119.875,46.99)
  Signal 3 w0.15: X5.50@82.326,6.532 82.326,7.701 88.475,13.85 97.024,13.85 100.8,17.626 100.8,34.027 106.721,39.948 115.927,39.948 117.935,37.94 119.33,37.94 v1(119.755,37.515)
  Signal 4 w0.15: v1(118.375,46.99) 122.25,43.115 122.25,37.875 121.25,36.875 120.395,36.875 v1(119.755,37.515)
HDATA18_1: D1.F1 R40.2 R86.2 X5.51 | length 60.4
  Top Layer 1 w0.3: v1(118.625,37.515) 118.682,37.457 118.813,37.457 D1.F1@119.237,37.033
  Signal 3 w0.15: X5.51@84.866,6.532 84.866,7.991 90.425,13.55 102.463,13.55 104.7,15.787 104.7,32.959 110.166,38.425 113.835,38.425 v1(114.26,38)
  Signal 4 w0.15: v1(114.26,38) 114.745,37.515 v1(118.625,37.515)
  Bottom Layer w0.15: R40.2@117.385,37.375 117.525,37.515 v1(118.625,37.515)
HDATA19_1: D1.G4 R38.2 R89.2 X5.52 | length 76.7
  Top Layer 1 w0.3: v1(121.761,35.518) D1.G4@122.256,36.014
  Signal 2 w0.15: v1(121.761,35.518) 122.243,36 134.115,36 v1(135.115,35) 135.74,34.375 v1(138.115,34.375)
  Signal 3 w0.15: X5.52@87.406,6.532 87.375,6.563 87.375,7.75 92.875,13.25 102.587,13.25 105,15.663 105,32.835 109.565,37.4 115.475,37.4 115.785,37.09 120.189,37.09 v1(121.761,35.518)
HDATA20_1: D1.G3 R36.2 X5.53 | length 71.2
  Top Layer 1 w0.3: v1(120.76,35.518) D1.G3@121.256,36.014
  Signal 2 w0.15: v1(120.76,35.518) 120.76,36.135 121.55,36.925 134.69,36.925 v1(135.115,36.5)
  Signal 3 w0.15: X5.53@89.946,6.532 89.946,7.946 94.95,12.95 102.711,12.95 105.3,15.539 105.3,32.711 109.689,37.1 115.275,37.1 115.925,36.45 119.828,36.45 v1(120.76,35.518)
HDATA21_1: D1.G2 R33.2 X5.54 | length 64.7
  Top Layer 1 w0.3: v1@119.755,35.518 119.758,35.518 120.254,36.014 D1.G2@120.256,36.014
  Signal 3 w0.15: X5.54@92.486,6.532 92.486,7.712 97.424,12.65 102.835,12.65 105.6,15.415 105.6,32.587 109.813,36.8 115.075,36.8 115.725,36.15 119.129,36.15 v1(119.761,35.518)
  Bottom Layer w0.15: v1(119.761,35.518) 120.279,35 131.415,35 132.115,35.7 R33.2@132.115,35.75
HDATA22_1: D1.G1 R30.2 X5.56 | length 45.5
  Top Layer 1 w0.3: v1(118.625,35.518) 118.682,35.575 118.817,35.575 D1.G1@119.237,35.995
  Signal 3 w0.15: X5.56@97.566,6.532 106.2,15.166 106.2,32.338 109.762,35.9 115.225,35.9 115.607,35.518 v1(118.625,35.518)
  Bottom Layer w0.15: R30.2@117.385,35.625 117.492,35.518 v1(118.625,35.518)
HDATA23_1: D1.H4 R27.2 X5.57 | length 59.9
  Top Layer 1 w0.3: v1(121.761,34.515) 121.761,34.517 D1.H4@122.256,35.014 D1.H4@122.256,35.014
  Signal 3 w0.15: X5.57@100.106,6.532 100.106,8.606 106.5,15 106.5,32.214 109.886,35.6 115.101,35.6 115.701,35 121.276,35 v1(121.761,34.515)
  Signal 4 w0.15: v1(121.761,34.515) 122.276,34 131.375,34 131.875,33.5 v1(135.115,33.5)
HDATA24_1: D1.H3 R24.2 X5.60 | length 52.3
  Top Layer 1 w0.3: v1@120.825,34.575 120.825,34.579 121.256,35.01 D1.H3@121.256,35.014
  Signal 3 w0.15: X5.60@107.726,6.532 107.41,6.848 107.41,7.435 107.4,7.445 107.4,31.841 109.809,34.25 115.104,34.25 115.354,34 120.245,34 v1(120.76,34.515)
  Bottom Layer w0.15: v1@120.76,34.512 121.197,34.075 131.145,34.075 131.294,34.224 132.089,34.224 R24.2@132.115,34.25
HDATA25_1: D1.H2 R21.2 X5.55 | length 51.1
  Top Layer 1 w0.3: v1(119.761,34.512) 119.761,34.515 120.256,35.011 D1.H2@120.256,35.014
  Signal 2 w0.15: v1(114.26,36.375) 120,36.375 120.25,36.125 120.25,35.001 v1@119.764,34.515
  Signal 3 w0.15: X5.55@95.026,6.532 95.026,7.901 99.475,12.35 102.96,12.35 105.9,15.29 105.9,32.462 109.813,36.375 v1(114.26,36.375)
HDATA26_1: D1.H1 R18.2 X5.58 | length 43
  Top Layer 1 w0.3: v1(118.625,34.512) 118.682,34.569 118.811,34.569 D1.H1@119.237,34.995
  Signal 3 w0.15: X5.58@102.646,6.532 106.8,10.686 106.8,30.711 106.8,32.089 110.011,35.3 114.825,35.3 115.575,34.55 118.587,34.55 v1(118.625,34.512)
  Bottom Layer w0.15: R18.2@117.385,34.125 118.238,34.125 v1(118.625,34.512)
HDATA27_1: D1.J4 R15.2 X5.63 | length 51.1
  Top Layer 1 w0.3: v1(121.761,33.515) 121.761,33.517 122.256,34.012 D1.J4@122.256,34.014
  Signal 3 w0.15: X5.63@115.346,6.532 114.125,7.753 114.125,25.701 115.125,26.701 115.125,31.375 116.75,33 121.246,33 v1(121.761,33.515)
  Signal 4 w0.15: v1(121.761,33.515) 122.227,33.05 134.45,33.05 135.25,32.25 137.49,32.25 v1(138.115,32.875)
HDATA28_1: D1.J3 R12.2 X5.62 | length 36.4
  Top Layer 1 w0.3: v1(120.76,33.515) 120.76,33.517 121.256,34.013 D1.J3@121.256,34.014
  Signal 2 w0.15: v1(114.26,33.375) 114.825,33.94 118.801,33.94 119.25,33.492 119.25,33.25 119.5,33 120.245,33 v1(120.76,33.515)
  Signal 3 w0.15: X5.62@112.637,6.363 X5.62@112.637,6.701 ; X5.62@112.806,6.532 113.825,7.551 113.825,25.825 114.825,26.825 114.825,32.81 v1(114.26,33.375)
HDATA29_1: D1.J2 R9.2 X5.59 | length 41.8
  Top Layer 1 w0.3: v1(119.761,33.515) 119.761,33.517 120.256,34.012 D1.J2@120.256,34.014
  Signal 2 w0.15: v1(114.26,34.875) 114.355,34.875 114.48,35 118.875,35 119.281,34.594 119.281,33.995 v1(119.761,33.515)
  Signal 3 w0.15: X5.59@105.186,6.532 107.1,8.446 107.1,31.965 110.01,34.875 v1(114.26,34.875)
HDATA30_1: D1.J1 R5.2 X5.61 | length 40.6
  Top Layer 1 w0.3: v1(118.625,33.515) 118.682,33.573 118.815,33.573 D1.J1@119.237,33.995
  Signal 3 w0.15: X5.61@110.266,6.532 107.7,9.098 107.7,31.717 109.783,33.8 114.95,33.8 115.235,33.515 v1(118.625,33.515)
  Bottom Layer w0.15: R5.2@117.385,32.625 117.623,32.863 117.972,32.863 v1(118.625,33.515)
HDATA31_1: D1.K3 R3.2 X5.64 | length 31.6
  Top Layer 1 w0.3: v1(120.76,32.514) 120.76,32.516 121.256,33.012 D1.K3@121.256,33.014
  Signal 2 w0.15: v1(114.912,25.537) 114.912,28.037 117.875,31 120,31 120.25,31.25 120.25,32.004 v1(120.76,32.514)
  Signal 3 w0.15: v1(114.912,25.537) 114.912,9.506 X5.64@117.886,6.532
HSYNC_1: D1.E11 R68.2 | length 3.5
  Top Layer 1 w0.3: D1.E11@129.256,38.014 129.26,38.014 129.757,38.511 v1(129.761,38.511)
  Bottom Layer w0.15: v1(129.761,38.511) 130.272,38 131.665,38 132.115,37.55 R68.2@132.115,37.5
HSYNC_5: D3.2 R68.1 | length 129
  Top Layer 1 w0.15: v1(25.875,37.25) 25.877,37.252 25.877,39.992 D3.2@25.878,39.994
  Signal 4 w0.15: v1(25.875,37.25) 28.75,34.375 32.599,34.375 40.899,42.675 48.104,42.675 55.729,50.3 99.103,50.3 101.153,48.25 119.534,48.25 120.034,47.75 122.875,47.75 124.413,46.212 125.837,46.212 127.04,47.415 127.551,47.415 131.21,47.415 132.125,46.5 132.125,39.01 v1(133.635,37.5)
INTRQ: D2.36 R154.1 | length 24.9
  Top Layer 1 w0.15: D2.36@28.018,13.952 v1(28.018,15.075) v1@28.018,15.107
  Signal 2 w0.15: v1(23.875,36.365) 28.018,32.222 28.5,31.74 28.5,21.25 27.625,20.375 27.625,15.468 v1(28.018,15.075)
LED_ERROR_3: D2.53 R166.1 | length 6.2
  Top Layer 1 w0.15: D2.53@36.768,16.702 36.781,16.715 37.632,16.715 38,17.082 v1(38,17.125)
  Bottom Layer w0.15: v1(38,17.125) 38,18.5 39.875,20.375 R166.1@40.615,20.375
LED_READ_3: D2.51 R168.1 | length 4.4
  Top Layer 1 w0.15: D2.51@36.768,15.702 37.218,15.702 37.603,15.317 37.933,15.317 v1(38,15.25)
  Bottom Layer w0.15: v1(38,15.25) 39.79,15.25 40.615,16.075 R168.1@40.615,16.125
LED_WRITE_3: D2.52 R167.1 | length 4.8
  Top Layer 1 w0.15: D2.52@36.768,16.202 36.806,16.164 37.961,16.164 v1(38,16.125)
  Bottom Layer w0.15: v1(38,16.125) 38.49,16.125 40.19,17.825 40.24,17.825 40.615,18.2 R167.1@40.615,18.25
LLC_5: D3.20 R78.1 | length 126.8
  Top Layer 1 w0.15: v1(33.644,43.5) 33.654,43.49 D3.20@34.874,43.49
  Signal 1 w0.15: v1(33.644,43.5) 50.394,60.25 123.75,60.25 132.656,51.344 132.656,40.219 133.125,39.75 134,39.75 134.875,38.875 135.885,38.875 v1(136.635,38.125)
MCLK_2: C1.2 D1.L12 ZQ1.3 | length 15.6
  Top Layer 1 w0.3: D1.L12@130.256,32.014 ccw(c130.732,32.49) 130.732,31.817 C1.2@143.552,31.817 143.552,31.829 ZQ1.3@145.754,31.829
nACK: D1.G11 D2.71 X5.21 | length 149.1
  Top Layer 1 w0.15: D2.71@36.768,25.702 38.452,25.702 v1(39.25,26.5)
  Top Layer 1 w0.3: D1.G11@129.256,36.014 129.259,36.014 129.755,35.518 v1(129.757,35.518)
  Signal 1 w0.15: v1(39.25,26.5) 40.125,25.625 50.125,25.625 56.5,32 104.625,32 110,37.375 117.75,37.375 118.05,37.075 128.2,37.075 v1(129.757,35.518)
  Signal 3 w0.15: X5.21@110.266,64.972 112.291,66.997 122.681,66.997 130.625,59.053 130.625,49.625 129.625,48.625 129.625,46.5 128.875,45.75 128.875,43.25 129.25,42.875 129.25,36.375 129.746,35.879 129.746,35.529 v1(129.757,35.518)
nCS: D1.H11 D2.88 X5.22 | length 168.2
  Top Layer 1 w0.15: D2.88@29.018,29.452 v1(29.018,30.75)
  Top Layer 1 w0.3: D1.H11@129.256,35.014 129.259,35.014 129.754,34.518 v1(129.757,34.518)
  Signal 1 w0.15: v1(29.018,30.75) 29.018,31.488 29.53,32 35.5,32 40.625,26.875 50.5,26.875 56,32.375 104.375,32.375 110.7,38.7 117.425,38.7 118.039,38.086 130.039,38.086 130.375,37.75 130.375,35.136 v1(129.757,34.518)
  Signal 3 w0.15: X5.22@107.726,64.972 110.051,67.297 122.805,67.297 131.25,58.852 131.25,46.75 130.375,45.875 130.375,35.136 v1(129.757,34.518)
nDACK0: D1.F11 K10.9 | length 46.5
  Top Layer 1 w0.3: D1.F11@129.256,37.014 v1(129.757,37.518)
  Signal 4 w0.15: K10.9@95.555,17.585 95.555,19.055 96.45,19.95 103.624,19.95 111.039,27.364 111.039,31.664 113.325,33.95 116.499,33.95 117.549,35 124.125,35 125.125,36 128.24,36 v1(129.757,37.518)
nDACK0_STM: D2.31 R136.2 | length 77.2
  Top Layer 1 w0.15: D2.31@25.518,13.952 25.518,12.982 26.875,11.625 38.25,11.625 40.75,14.125 98.321,14.125 v1(99.615,15.42)
nDACK1: D1.F9 K10.4 | length 43.4
  Top Layer 1 w0.3: v1(126.75,36.5) 126.75,36.504 127.256,37.01 D1.F9@127.256,37.014
  Signal 4 w0.15: K10.4@95.555,22.665 95.555,21.195 96.5,20.25 103.5,20.25 110.739,27.489 110.739,31.114 110.739,31.788 113.201,34.25 116.375,34.25 118.125,36 124.125,36 125.125,37 126.25,37 v1(126.75,36.5)
nDACK1_STM: D2.30 R130.2 | length 87
  Top Layer 1 w0.15: D2.30@25.018,13.952 25.018,17.268 39.375,31.625 87.375,31.625 93,26 99.375,26 99.615,25.76 v1(99.615,25.072)
nDREQ0: D1.F12 K9.9 | length 87.4
  Top Layer 1 w0.15: K9.9@77.68,52.085 80.095,54.5 132,54.5 141,45.5 141,38.646 138.104,35.75 132.375,35.75 131.092,37.033 D1.F12@130.275,37.033
nDREQ0_STM: D2.98 R135.2 | length 104.5
  Top Layer 1 w0.15: D2.98@24.018,29.452 24.018,31.309 v1@24.709,32
  Signal 4 w0.15: v1@24.709,32 17.875,38.834 17.875,50.75 27.25,60.125 80.125,60.125 81.25,59 82.625,59 v1(83.125,59.5)
  Bottom Layer w0.15: R135.2@81.792,49.799 81.792,49.849 82.167,50.224 82.217,50.224 83.125,51.132 v1(83.125,59.5)
  other v1: 24.75,32
nDREQ1: D1.F10 K9.4 | length 96.1
  Top Layer 1 w0.3: D1.F10@128.256,37.014 v1(128.761,37.518)
  Signal 4 w0.15: K9.4@77.68,57.165 78.915,58.4 135.176,58.4 142.2,51.376 142.2,40.2 137.875,35.875 133.5,35.875 131.375,38 129.244,38 v1(128.761,37.518)
nDREQ1_STM: D2.97 R129.2 | length 93.5
  Top Layer 1 w0.15: D2.97@24.518,29.452 24.518,30.548 24.75,30.78 v1(24.75,30.875)
  Signal 4 w0.15: v1(24.75,30.875) 17.375,38.25 17.375,51.125 26.85,60.6 80.643,60.6 v1(81.665,59.578)
NetC48_2: C48.2 R49.2 R50.2 | length 3.4
  Top Layer 1 w0.3: C48.2@50.694,64.374 50.694,65.902 R50.2@50.819,66.027 50.694,66.152 R49.2@50.694,67.68
NetC49_2: C49.2 R51.2 R52.1 | length 3.4
  Top Layer 1 w0.3: C49.2@10.76,64.374 10.885,64.499 R52.1@10.885,66.027 10.885,67.555 R51.2@10.76,67.68
NetC50_2: C50.2 R53.2 R54.1 | length 3.4
  Top Layer 1 w0.3: C50.2@30.826,64.247 30.826,65.775 R54.1@30.951,65.9 30.826,66.025 R53.2@30.826,67.553
NetC54_1: C54.1 R57.2 | length 4.3
  Top Layer 1 w0.3: C54.1@39.905,53.875 39.909,53.871 40.629,53.871 41.519,52.981 R57.2@41.519,50.635
NetC56_1: C56.1 R58.2 | length 1.6
  Top Layer 1 w0.3: R58.2@39.905,50.625 C56.1@39.905,52.25
NetC70_1: C70.1 D4.4 L5.2 VD35.1 VD36.1 | length 8.8
  Bottom Layer w0.5: L5.2@150.675,10.025 L5.2@150.825,9.875 ; C70.1@152.465,7.295 C70.1@152.625,7.135
  Bottom Layer w0.7: L5.2@150.825,9.875 150.825,12.025 D4.4@150.825,12.175
  Bottom Layer w0.8: VD35.1@150.825,7.125 150.925,7.125 150.935,7.135 C70.1@152.625,7.135
  Bottom Layer w1: VD36.1@150.825,5.25 VD35.1@150.825,7.125 ; VD35.1@150.825,7.5 L5.2@150.825,9.875
NetD4_3: D4.3 R171.2 | length 1.9
  Bottom Layer w0.7: R171.2@150.635,16.25 150.735,16.15 150.735,16.1 151.005,15.83 151.005,14.905 150.825,14.725 D4.3@150.825,14.575
NetD4_5: D4.5 L5.1 | length 2.5
  Bottom Layer w0.7: L5.1@148.425,9.875 148.675,10.125 148.675,11.775 148.925,12.025 D4.5@148.925,12.175
NetK1_3: K1.3 R107.1 | length 2.2
  Top Layer 1 w0.7: K1.3@62.693,57.192 K1.3@62.72,57.165
  Bottom Layer w0.7: K1.3@62.693,57.192 R107.1@62.693,59.343
NetK1_10: K1.10 R109.1 | length 2.2
  Bottom Layer w0.7: R109.1@62.667,49.869 62.693,49.896 62.693,52.059 K1.10@62.72,52.085
NetK1_12: K1.12 VD15.1 VT1.3 | length 6.8
  Bottom Layer w0.7: VT1.3@66.691,54.625 68.2,54.625 cw(c68.2,53.925) 68.696,54.419 69.888,53.227 cw(c69.499,52.838) 70.006,53.052 VD15.1@70.263,52.852 ; K1.12@67.8,52.085 67.854,52.139 69.25,52.139 VD15.1@69.963,52.852
NetK2_3: K2.3 R103.1 | length 2.3
  Bottom Layer w0.7: R103.1@98.05,36.576 98.072,36.554 98.072,34.313 K2.3@98.095,34.29
NetK2_10: K2.10 R110.1 | length 2.3
  Bottom Layer w0.7: R110.1@98.05,26.951 98.072,26.973 98.072,29.187 K2.10@98.095,29.21
NetK2_12: K2.12 VD16.1 VT2.3 | length 8.2
  Bottom Layer w0.7: VT2.3@101.685,31.75 105,31.75 105.638,31.112 VD16.1@105.638,29.85 105.438,29.65 105.105,29.65 104.665,29.21 K2.12@103.175,29.21
NetK3_3: K3.3 R104.1 | length 2.3
  Bottom Layer w0.7: K3.3@62.595,45.665 62.632,45.702 62.632,47.902 R104.1@62.669,47.939
NetK3_10: K3.10 R111.1 | length 2.2
  Top Layer 1 w0.7: K3.10@62.595,40.585 K3.10@62.632,40.548
  Bottom Layer w0.7: R111.1@62.632,38.351 K3.10@62.632,40.548
NetK3_12: K3.12 VD17.1 VT3.3 | length 7.7
  Bottom Layer w0.7: VT3.3@66.439,43.125 69.125,43.125 69.92,42.33 69.92,41.425 VD17.1@70.12,41.225 ; K3.12@67.675,40.585 69.228,40.585 69.638,40.995 69.638,41.025 69.838,41.225 VD17.1@70.138,41.225
NetK4_3: K4.3 R105.1 | length 2.2
  Bottom Layer w0.7: R105.1@97.925,47.997 97.947,47.975 97.947,45.813 K4.3@97.97,45.79
NetK4_10: K4.10 R112.1 | length 2.2
  Bottom Layer w0.7: K4.10@97.97,40.71 98.01,40.67 98.01,38.537 R112.1@98.05,38.497
NetK4_12: K4.12 VD18.1 VT4.3 | length 7.9
  Bottom Layer w0.7: VT4.3@101.687,43.377 104.373,43.377 105.295,42.455 105.295,41.677 105.495,41.477 VD18.1@105.64,41.477 ; K4.12@103.05,40.71 104.73,40.71 105.14,41.12 105.14,41.277 VD18.1@105.34,41.477